# Altium PCB PWR Board 10A.PcbDoc (part 7 of 10)
Units mm, origin at the board's own origin, x right, y up, seen from the top; angles counter-clockwise.
Board outline 355 x 325 mm, 4 copper layers (Top Layer, Layer 1, Layer 2, Bottom Layer), stack 1.636 mm thick; 617 components, 308 nets, 1518 pads, 1199 vias.
Unrouted connection lines stored in the file: 361.
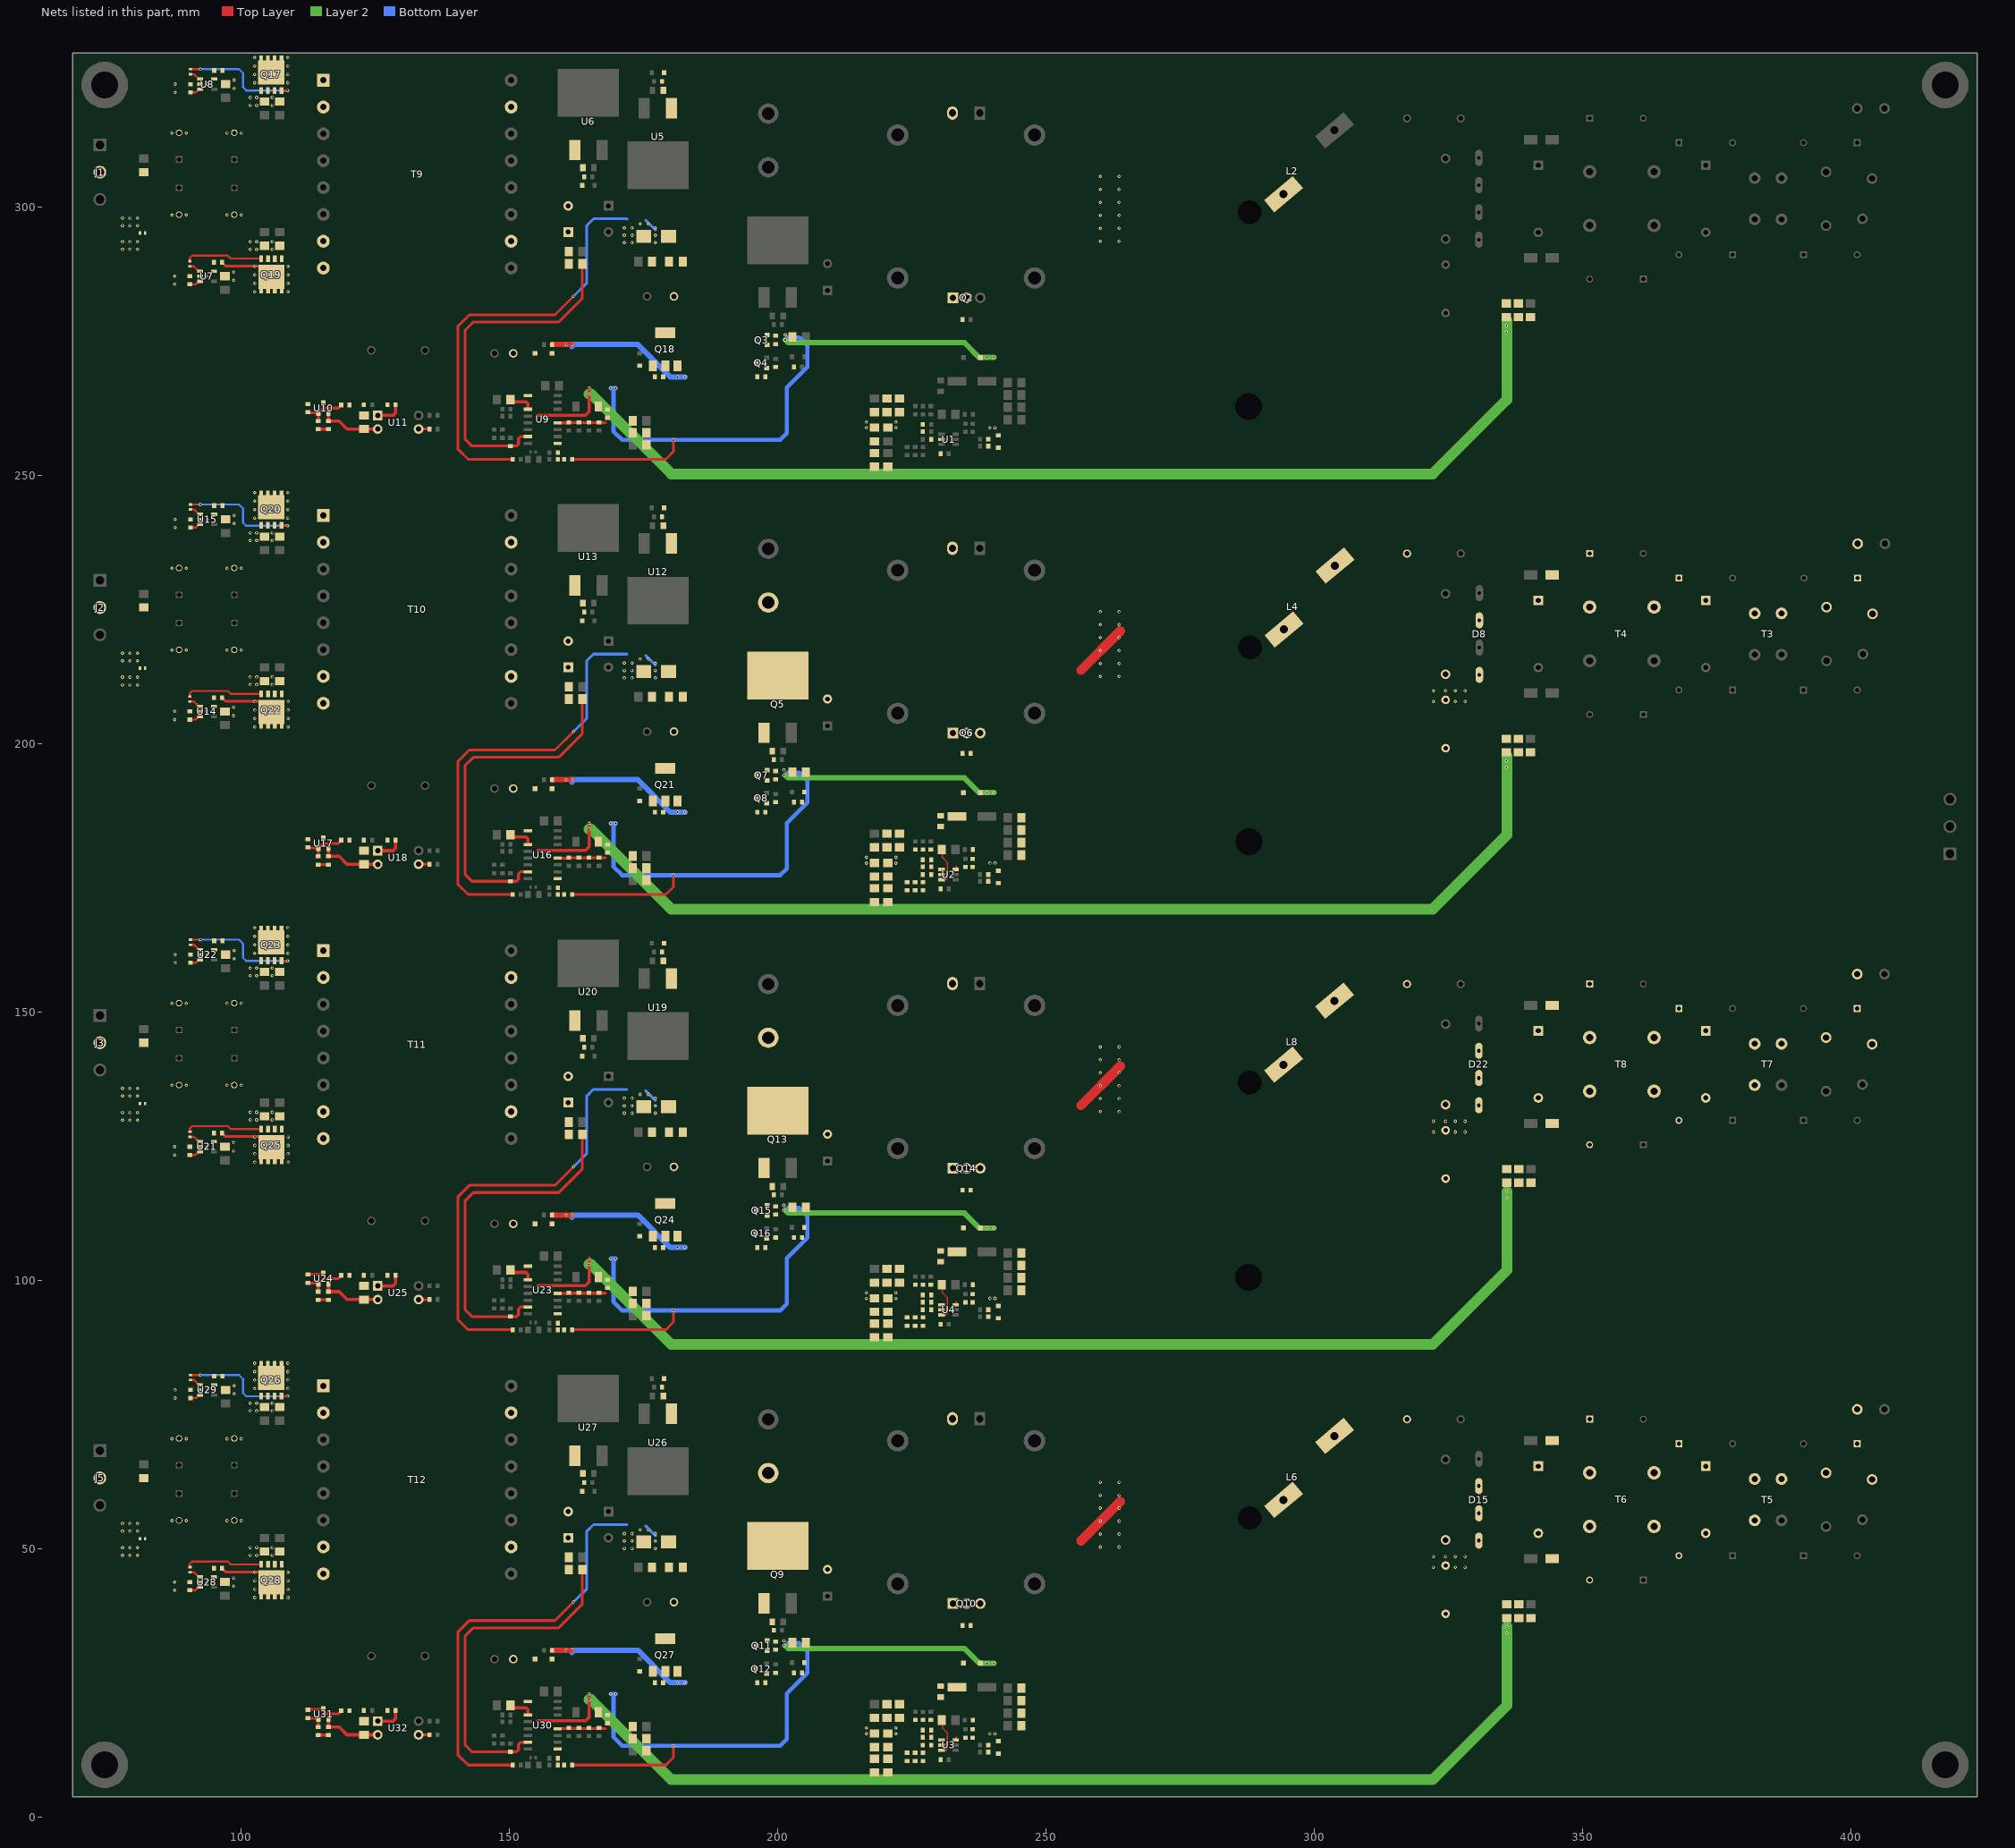
[diagram p5: the nets of this part, all layers, seen from the top]

## Via types
v1: diameter 0.6, hole 0.3, Top Layer to Bottom Layer, 1199 vias

## Nets (pads, with @x,y where several pads share a name; then routed paths per layer and width w, separated by ;. In a path a pad name is that pad's centre, name@x,y a point inside that pad or via, vN(x,y) a via of type N, cw(c..) or ccw(c..) an arc to the next point about the centre after c; other vN are vias at no path point) (continued)
NetC27_2: C27.2 D8.1 L3.1
  other v1: 322.224,207.797 326.339,207.797 328.137,207.797 322.224,209.79 324.51,209.79 326.339,209.79 328.137,209.79
NetC28_2: C28.2 L3.2 L4.1
NetC29_1: C29.1 C34.1 F2.2 T3.2 VR2.1
NetC30_1: C30.1 C32.1 T3.3 T4.2
NetC31_1: C31.1 C33.1 D8.3 D9.2 T4.3
NetC35_2: C35.2 Q5.2 RT2.2
NetC36_2: C36.2 Q5.1 Q7.3 R28.2
NetC37_1: C37.1 C38.2 C39.2 R36.1 R39.1 R41.2
NetC38_1: C38.1 C39.1 Q6.3 R35.2 R41.1 R47.1 R48.1 R49.2 R50.2
NetC40_1: C40.1 D14.1 R45.2
NetC41_2: C41.2 C42.2 U2.6 | length 0.3
  Top Layer w0.381: U2.6@233.189,176.763 233.375,176.948
NetC42_1: C42.1 R46.2 | length 0.1
  Top Layer w0.381: C42.1@236.356,178.472 C42.1@236.394,178.51 ; R46.2@236.394,180.187 R46.2@236.432,180.225
NetC43_2: C43.2 R40.2 U2.3 | length 7
  Top Layer w0.254: U2.3@230.569,174.607 231.415,174.607 231.619,174.81 231.619,177.85 230.762,178.708 230.762,180.073 C43.2@230.609,180.225
NetC44_1: C44.1 D13.2 R40.1
NetC45_2: C45.2 R37.1 R38.1 R43.2 R44.2 U2.1
NetC48_2: C48.2 C53.2 T5.4 T6.1
NetC49_2: C49.2 C54.2 D15.2 D17.2 T6.4
NetC50_2: C50.2 D15.1 L5.1
  other v1: 322.224,46.496 326.339,46.496 328.137,46.496 322.224,48.489 324.51,48.489 326.339,48.489 328.137,48.489
NetC51_2: C51.2 L5.2 L6.1
NetC52_1: C52.1 C57.1 F3.2 T5.2 VR3.1
NetC53_1: C53.1 C55.1 T5.3 T6.2
NetC54_1: C54.1 C56.1 D15.3 D16.2 T6.3
NetC58_2: C58.2 Q9.2 RT3.2
NetC59_2: C59.2 Q9.1 Q11.3 R54.2
NetC60_1: C60.1 C61.2 C62.2 R62.1 R65.1 R67.2
NetC61_1: C61.1 C62.1 Q10.3 R61.2 R67.1 R73.1 R74.1 R75.2 R76.2
NetC63_1: C63.1 D21.1 R71.2
NetC64_2: C64.2 C65.2 U3.6 | length 0.3
  Top Layer w0.381: U3.6@233.189,14.558 233.375,14.744
NetC65_1: C65.1 R72.2 | length 0.1
  Top Layer w0.381: C65.1@236.356,16.268 C65.1@236.394,16.306 ; R72.2@236.394,17.982 R72.2@236.432,18.02
NetC66_2: C66.2 R66.2 U3.3 | length 7
  Top Layer w0.254: U3.3@230.569,12.402 231.415,12.402 231.619,12.605 231.619,15.646 230.762,16.503 230.762,17.868 C66.2@230.609,18.02
NetC67_1: C67.1 D20.2 R66.1
NetC68_2: C68.2 R63.1 R64.1 R69.2 R70.2 U3.1
NetC71_2: C71.2 C76.2 T7.4 T8.1
NetC72_2: C72.2 C77.2 D22.2 D24.2 T8.4
NetC73_2: C73.2 D22.1 L7.1
  other v1: 322.224,127.598 326.339,127.598 328.137,127.598 322.224,129.591 324.51,129.591 326.339,129.591 328.137,129.591
NetC74_2: C74.2 L7.2 L8.1
NetC75_1: C75.1 C80.1 F4.2 T7.2 VR4.1
NetC76_1: C76.1 C78.1 T7.3 T8.2
NetC77_1: C77.1 C79.1 D22.3 D23.2 T8.3
NetC81_2: C81.2 Q13.2 RT4.2
NetC82_2: C82.2 Q13.1 Q15.3 R80.2
NetC83_1: C83.1 C84.2 C85.2 R88.1 R91.1 R93.2
NetC84_1: C84.1 C85.1 Q14.3 R87.2 R93.1 R99.1 R100.1 R101.2 R102.2
NetC86_1: C86.1 D28.1 R97.2
NetC87_2: C87.2 C88.2 U4.6 | length 0.3
  Top Layer w0.381: U4.6@233.189,95.661 233.375,95.846
NetC88_1: C88.1 R98.2 | length 0.1
  Top Layer w0.381: C88.1@236.356,97.37 C88.1@236.394,97.408 ; R98.2@236.394,99.084 R98.2@236.432,99.123
NetC89_2: C89.2 R92.2 U4.3 | length 7
  Top Layer w0.254: U4.3@230.569,93.504 231.415,93.504 231.619,93.708 231.619,96.748 230.762,97.605 230.762,98.97 C89.2@230.609,99.123
NetC90_1: C90.1 D27.2 R92.1
NetC91_2: C91.2 R89.1 R90.1 R95.2 R96.2 U4.1
NetC94_2: C94.2 C102.1 C103.2 C104.2 T9.10
NetC105_1: C105.1 C106.2 Q18.2 Q18.4 R107.1 R109.2
NetC109_2: C109.2 U7.3 | length 2.1
  Top Layer w0.381: C109.2@90.546,285.528 91.542,285.528 92.007,285.993 92.266,285.993 U7.3@92.375,286.102
NetC111_2: C111.2 U8.3 | length 2.1
  Top Layer w0.381: C111.2@90.602,321.317 91.598,321.317 92.062,321.782 92.321,321.782 U8.3@92.431,321.891
NetC118_1: C118.1 C120.1 D34.2 U9.3 | length 4.6
  Top Layer w0.6: C120.1@150.237,264 150.606,263.631 153.134,263.631 153.486,263.28 U9.3@153.486,262.262
NetC124_2: C124.2 R123.1 R126.2 U9.9
NetC126_1: C126.1 R133.2 U10.2 U11.2 | length 11.2
  Top Layer w0.6: U10.2@116.323,261.467 C126.1@116.323,260.049 118.313,260.049 119.794,258.569 U11.2@125.502,258.569
NetC126_2: C126.2 R130.1 | length 1.9
  Top Layer w0.6: R130.1@114.423,258.525 C126.2@116.323,258.525
NetC129_2: C129.2 C137.1 C138.2 C139.2 T10.10
NetC140_1: C140.1 C141.2 Q21.2 Q21.4 R137.1 R139.2
NetC144_2: C144.2 U14.3 | length 2.1
  Top Layer w0.381: C144.2@90.546,204.426 91.542,204.426 92.007,204.891 92.266,204.891 U14.3@92.375,205
NetC146_2: C146.2 U15.3 | length 4.1
  Top Layer w0.381: 91.598,240.215 C146.2@90.602,240.215 91.598,240.215 ; 91.598,240.215 U15.3@92.062,240.679 ; 91.598,240.215 U15.3@92.062,240.679 ; U15.3@92.062,240.679 U15.3@92.321,240.679 ; U15.3@92.062,240.679 U15.3@92.321,240.679 ; U15.3@92.321,240.679 U15.3@92.431,240.789 U15.3@92.321,240.679
NetC153_1: C153.1 C155.1 D40.2 U16.3 | length 4.6
  Top Layer w0.6: C155.1@150.237,182.898 150.606,182.529 153.134,182.529 153.486,182.177 U16.3@153.486,181.16
NetC159_2: C159.2 R153.1 R156.2 U16.9
NetC161_1: C161.1 R163.2 U17.2 U18.2 | length 11.2
  Top Layer w0.6: U17.2@116.323,180.364 C161.1@116.323,178.947 118.313,178.947 119.794,177.466 U18.2@125.501,177.466
NetC161_2: C161.2 R160.1 | length 1.9
  Top Layer w0.508: R160.1@114.423,177.423 C161.2@116.323,177.423
NetC164_2: C164.2 C172.1 C173.2 C174.2 T11.10
NetC175_1: C175.1 C176.2 Q24.2 Q24.4 R167.1 R169.2
NetC179_2: C179.2 U21.3 | length 2.1
  Top Layer w0.381: C179.2@90.546,123.324 91.542,123.324 92.007,123.788 92.266,123.788 U21.3@92.375,123.898
NetC181_2: C181.2 U22.3 | length 4.1
  Top Layer w0.381: 91.598,159.112 C181.2@90.602,159.112 91.598,159.112 ; 91.598,159.112 U22.3@92.062,159.577 ; 91.598,159.112 U22.3@92.062,159.577 ; U22.3@92.062,159.577 U22.3@92.321,159.577 ; U22.3@92.062,159.577 U22.3@92.321,159.577 ; U22.3@92.321,159.577 U22.3@92.431,159.686 U22.3@92.321,159.577
NetC188_1: C188.1 C190.1 D46.2 U23.3 | length 4.6
  Top Layer w0.6: C190.1@150.237,101.796 150.606,101.427 153.134,101.427 153.486,101.075 U23.3@153.486,100.057
NetC194_2: C194.2 R183.1 R186.2 U23.9
NetC196_1: C196.1 R193.2 U24.2 U25.2 | length 11.2
  Top Layer w0.6: U24.2@116.323,99.262 C196.1@116.323,97.844 118.313,97.844 119.794,96.364 U25.2@125.501,96.364
NetC196_2: C196.2 R190.1 | length 1.9
  Top Layer w0.508: R190.1@114.423,96.32 C196.2@116.323,96.32
NetC199_2: C199.2 C207.1 C208.2 C209.2 T12.10
NetC210_1: C210.1 C211.2 Q27.2 Q27.4 R197.1 R199.2
NetC214_2: C214.2 U28.3 | length 2.1
  Top Layer w0.381: C214.2@90.545,42.207 91.54,42.207 92.005,42.671 92.264,42.671 U28.3@92.373,42.781
NetC216_2: C216.2 U29.3 | length 6.2
  Top Layer w0.381: C216.2@90.602,78.01 91.598,78.01 ; C216.2@90.602,78.01 91.598,78.01 ; C216.2@90.602,78.01 91.598,78.01 ; 91.598,78.01 U29.3@92.062,78.474 ; 91.598,78.01 U29.3@92.062,78.474 ; 91.598,78.01 U29.3@92.062,78.474 ; U29.3@92.062,78.474 U29.3@92.321,78.474 ; U29.3@92.062,78.474 U29.3@92.321,78.474 ; U29.3@92.062,78.474 U29.3@92.321,78.474 ; U29.3@92.321,78.474 U29.3@92.431,78.584 ; U29.3@92.321,78.474 U29.3@92.431,78.584 ; U29.3@92.321,78.474 U29.3@92.431,78.584
NetC223_1: C223.1 C225.1 D52.2 U30.3 | length 4.6
  Top Layer w0.6: C225.1@150.237,20.693 150.606,20.324 153.134,20.324 153.486,19.973 U30.3@153.486,18.955
NetC229_2: C229.2 R213.1 R216.2 U30.9
NetC231_1: C231.1 R223.2 U31.2 U32.2 | length 11.2
  Top Layer w0.6: U31.2@116.323,18.159 C231.1@116.323,16.742 118.313,16.742 119.794,15.261 U32.2@125.501,15.262
NetC231_2: C231.2 R220.1 | length 1.9
  Top Layer w0.508: R220.1@114.423,15.218 C231.2@116.323,15.218
NetD5_1: D5.1 R8.2
NetD5_2: D5.2 Q2.1 R5.2 R9.1
  other v1: 239.59,258.813 240.529,258.825
NetD12_1: D12.1 R34.2
NetD12_2: D12.2 Q6.1 R31.2 R35.1
  other v1: 239.59,177.69 240.529,177.703
NetD19_1: D19.1 R60.2
NetD19_2: D19.2 Q10.1 R57.2 R61.1
  other v1: 239.59,15.485 240.529,15.498
NetD26_1: D26.1 R86.2
NetD26_2: D26.2 Q14.1 R83.2 R87.1
  other v1: 239.59,96.588 240.529,96.6
NetD29_2: D29.2 R105.2 R106.1 U5.1
NetD30_1: D30.1 R108.2 T9.15 | length 82.7
  Top Layer w0.508: R108.2@150.622,252.94 142.357,252.94 140.418,254.879 140.418,277.694 142.582,279.857 158.538,279.857 v1(162.018,283.337)
  Bottom Layer w0.508: v1(162.018,283.337) 164.465,285.784 164.465,296.52 165.684,297.739 171.958,297.739 172.034,297.663 ; 175.424,297.51 177.24,295.695 ; v1(177.24,293.295) v1@177.266,293.268
  other v1: 171.45,293.295 172.872,293.295 171.45,294.679 172.872,294.679 177.24,294.679 171.45,296.063 172.872,296.063 177.24,296.063 174.396,296.799 175.895,296.799
NetD30_2: D30.2 R107.2
NetD31_2: D31.2 R110.2 R111.1 U6.1
NetD32_1: D32.1 Q18.1 R109.1
NetD33_2: D33.2 R120.2
NetD35_2: D35.2 R135.2 R136.1 U12.1
NetD36_1: D36.1 R138.2 T10.15 | length 82.6
  Top Layer w0.508: R138.2@150.622,171.838 142.357,171.838 140.418,173.777 140.418,196.591 142.582,198.755 158.538,198.755 v1(162.018,202.235)
  Bottom Layer w0.508: v1(162.018,202.235) 164.465,204.682 164.465,215.417 165.684,216.636 171.958,216.636 ; 175.424,216.407 177.24,214.592 ; v1(177.24,212.192) v1@177.266,212.166
  other v1: 171.45,212.192 172.872,212.192 171.45,213.576 172.872,213.576 177.24,213.576 171.45,214.96 172.872,214.96 177.24,214.96 174.396,215.697 175.895,215.697
NetD36_2: D36.2 R137.2
NetD37_2: D37.2 R140.2 R141.1 U13.1
NetD38_1: D38.1 Q21.1 R139.1
NetD39_2: D39.2 R150.2
NetD41_2: D41.2 R165.2 R166.1 U19.1
NetD42_1: D42.1 R168.2 T11.15 | length 82.6
  Top Layer w0.508: R168.2@150.622,90.736 142.357,90.736 140.418,92.675 140.418,115.489 142.582,117.653 158.538,117.653 v1(162.018,121.132)
  Bottom Layer w0.508: v1(162.018,121.132) 164.465,123.58 164.465,134.315 165.684,135.534 171.958,135.534 ; 175.424,135.305 177.24,133.49 ; v1(177.24,131.09) v1@177.266,131.064
  other v1: 171.45,131.09 172.872,131.09 171.45,132.474 172.872,132.474 177.24,132.474 171.45,133.858 172.872,133.858 177.24,133.858 174.396,134.594 175.895,134.594
NetD42_2: D42.2 R167.2
NetD43_2: D43.2 R170.2 R171.1 U20.1
NetD44_1: D44.1 Q24.1 R169.1
NetD45_2: D45.2 R180.2
NetD47_2: D47.2 R195.2 R196.1 U26.1
NetD48_1: D48.1 R198.2 T12.15 | length 82.6
  Top Layer w0.508: R198.2@150.622,9.633 142.357,9.633 140.418,11.572 140.418,34.387 142.582,36.55 158.538,36.55 v1(162.018,40.03)
  Bottom Layer w0.508: v1(162.018,40.03) 164.465,42.477 164.465,53.213 165.684,54.432 171.958,54.432 ; 175.424,54.203 177.24,52.388 ; v1(177.24,49.988) v1@177.266,49.961
  other v1: 171.45,49.988 172.872,49.988 171.45,51.372 172.872,51.372 177.24,51.372 171.45,52.756 172.872,52.756 177.24,52.756 174.396,53.492 175.895,53.492
NetD48_2: D48.2 R197.2
NetD49_2: D49.2 R200.2 R201.1 U27.1
NetD50_1: D50.1 Q27.1 R199.1
NetD51_2: D51.2 R210.2
NetQ3_1: Q3.1 Q4.3 R16.1
NetQ4_1: Q4.1 R19.1 R25.2 R26.2
NetQ7_1: Q7.1 Q8.3 R42.1
NetQ8_1: Q8.1 R45.1 R51.2 R52.2
NetQ11_1: Q11.1 Q12.3 R68.1
NetQ12_1: Q12.1 R71.1 R77.2 R78.2
NetQ15_1: Q15.1 Q16.3 R94.1
NetQ16_1: Q16.1 R97.1 R103.2 R104.2
NetR1_1: R1.1 R3.2
NetR3_1: R3.1 R6.2
NetR4_1: R4.1 R7.2
NetR6_1: R6.1 R11.2 R12.2
NetR7_1: R7.1 R10.2
NetR27_1: R27.1 R29.2
NetR29_1: R29.1 R32.2
NetR30_1: R30.1 R33.2
NetR32_1: R32.1 R37.2 R38.2
NetR33_1: R33.1 R36.2
NetR53_1: R53.1 R55.2
NetR55_1: R55.1 R58.2
NetR56_1: R56.1 R59.2
NetR58_1: R58.1 R63.2 R64.2
NetR59_1: R59.1 R62.2
NetR79_1: R79.1 R81.2
NetR81_1: R81.1 R84.2
NetR82_1: R82.1 R85.2
NetR84_1: R84.1 R89.2 R90.2
NetR85_1: R85.1 R88.2
NetR113_2: R113.2 U7.5
NetR114_2: R114.2 U8.5
NetR115_2: R115.2 U7.1 | length 2.2
  Top Layer w0.381: R115.2@90.546,288.894 91.234,288.894 92.016,288.112 92.266,288.112 U7.1@92.375,288.002
NetR116_2: R116.2 U8.1 | length 2.2
  Top Layer w0.381: R116.2@90.602,324.683 91.289,324.683 92.071,323.901 92.321,323.901 U8.1@92.431,323.791
NetR117_2: R117.2 R118.1
NetR118_2: R118.2 R119.1
NetR119_2: R119.2 U9.1 | length 211.9
  Top Layer w0.6: 155.332,261.163 164.214,261.163 164.871,261.82 v1(164.871,265.138) v1(164.871,266.192)
  Layer 2 w2: v1(164.871,265.138) 165.265,265.138 180.209,250.194 322.076,250.194 335.915,264.033 335.915,277.518 335.915,278.754
  other v1: 335.813,276.615 335.813,277.851
NetR121_1: R121.1 R122.2
NetR122_1: R122.1 R124.2
NetR127_1: R127.1 R130.2 R131.1 U10.1 | length 8.4
  Top Layer w0.508: R127.1@112.463,261.705 112.534,261.633 114.267,261.633 114.423,261.477 U10.1@114.423,261.467 R130.2@114.423,260.049 ; U10.1@114.423,261.517 115.378,262.471 118.152,262.471 118.56,262.879 118.567,262.879 118.694,263.006 R131.1@118.694,263.07
NetR129_2: R129.2 U11.3 | length 2
  Top Layer w0.508: U11.3@133.121,258.579 R129.2@135.128,258.579
NetR131_2: R131.2 R132.1 R133.1 R134.2
NetR134_1: R134.1 U11.1 | length 5
  Top Layer w0.6: U11.1@125.501,261.109 128.368,261.109 128.829,261.569 R134.1@128.829,263.095
NetR143_2: R143.2 U14.5
NetR144_2: R144.2 U15.5
NetR145_2: R145.2 U14.1 | length 2.2
  Top Layer w0.381: R145.2@90.546,207.792 91.234,207.792 92.016,207.01 92.266,207.01 U14.1@92.375,206.9
NetR146_2: R146.2 U15.1 | length 4.4
  Top Layer w0.381: 91.289,243.58 R146.2@90.602,243.58 91.289,243.58 ; 91.289,243.58 U15.1@92.071,242.798 ; 91.289,243.58 U15.1@92.071,242.798 ; U15.1@92.071,242.798 U15.1@92.321,242.798 ; U15.1@92.071,242.798 U15.1@92.321,242.798 ; U15.1@92.321,242.798 U15.1@92.431,242.689 U15.1@92.321,242.798
NetR147_2: R147.2 R148.1
NetR148_2: R148.2 R149.1
NetR149_2: R149.2 U16.1 | length 211.9
  Top Layer w0.6: 155.332,180.06 164.214,180.06 164.871,180.718 v1(164.871,184.036) v1(164.871,185.09)
  Layer 2 w2: v1(164.871,184.036) 165.265,184.036 180.209,169.091 322.076,169.091 335.915,182.931 335.915,196.415 335.915,197.651
  other v1: 335.813,195.512 335.813,196.748
NetR151_1: R151.1 R152.2
NetR152_1: R152.1 R154.2
NetR157_1: R157.1 R160.2 R161.1 U17.1 | length 8.4
  Top Layer w0.508: R157.1@112.462,180.602 112.534,180.53 114.267,180.53 114.423,180.374 U17.1@114.423,180.364 R160.2@114.423,178.947 ; U17.1@114.423,180.414 115.377,181.368 118.152,181.368 118.56,181.777 118.567,181.777 118.694,181.904 R161.1@118.694,181.967
NetR159_2: R159.2 U18.3 | length 2
  Top Layer w0.508: U18.3@133.121,177.476 R159.2@135.128,177.476
NetR161_2: R161.2 R162.1 R163.1 R164.2
NetR164_1: R164.1 U18.1 | length 5
  Top Layer w0.6: U18.1@125.501,180.006 128.368,180.006 128.829,180.467 R164.1@128.829,181.993
NetR173_2: R173.2 U21.5
NetR174_2: R174.2 U22.5
NetR175_2: R175.2 U21.1 | length 2.2
  Top Layer w0.381: R175.2@90.546,126.689 91.234,126.689 92.016,125.907 92.266,125.907 U21.1@92.375,125.798
NetR176_2: R176.2 U22.1 | length 4.4
  Top Layer w0.381: 91.289,162.478 R176.2@90.602,162.478 91.289,162.478 ; 91.289,162.478 U22.1@92.071,161.696 ; 91.289,162.478 U22.1@92.071,161.696 ; U22.1@92.071,161.696 U22.1@92.321,161.696 ; U22.1@92.071,161.696 U22.1@92.321,161.696 ; U22.1@92.321,161.696 U22.1@92.431,161.586 U22.1@92.321,161.696
NetR177_2: R177.2 R178.1
NetR178_2: R178.2 R179.1
NetR179_2: R179.2 U23.1 | length 211.9
  Top Layer w0.6: 155.332,98.958 164.214,98.958 164.871,99.615 v1(164.871,102.934) v1(164.871,103.987)
  Layer 2 w2: v1(164.871,102.934) 165.265,102.934 180.209,87.989 322.076,87.989 335.915,101.828 v1(335.915,115.313) v1(335.915,116.549)
NetR181_1: R181.1 R182.2
NetR182_1: R182.1 R184.2
NetR187_1: R187.1 R190.2 R191.1 U24.1 | length 8.4
  Top Layer w0.508: R187.1@112.462,99.5 112.534,99.428 114.267,99.428 114.423,99.272 U24.1@114.423,99.262 R190.2@114.423,97.844 ; U24.1@114.423,99.312 115.377,100.266 118.152,100.266 118.56,100.674 118.567,100.674 118.694,100.801 R191.1@118.694,100.865
NetR189_2: R189.2 U25.3 | length 2
  Top Layer w0.508: U25.3@133.121,96.374 R189.2@135.128,96.374
NetR191_2: R191.2 R192.1 R193.1 R194.2
NetR194_1: R194.1 U25.1 | length 5
  Top Layer w0.6: U25.1@125.501,98.904 128.368,98.904 128.829,99.364 R194.1@128.829,100.89
NetR203_2: R203.2 U28.5
NetR204_2: R204.2 U29.5
NetR205_2: R205.2 U28.1 | length 2.2
  Top Layer w0.381: R205.2@90.545,45.572 91.232,45.572 92.014,44.79 92.264,44.79 U28.1@92.373,44.681
NetR206_2: R206.2 U29.1 | length 6.6
  Top Layer w0.381: R206.2@90.602,81.375 91.289,81.375 ; R206.2@90.602,81.375 91.289,81.375 ; R206.2@90.602,81.375 91.289,81.375 ; 91.289,81.375 U29.1@92.071,80.593 ; 91.289,81.375 U29.1@92.071,80.593 ; 91.289,81.375 U29.1@92.071,80.593 ; U29.1@92.071,80.593 U29.1@92.321,80.593 ; U29.1@92.071,80.593 U29.1@92.321,80.593 ; U29.1@92.071,80.593 U29.1@92.321,80.593 ; U29.1@92.321,80.593 U29.1@92.431,80.484 ; U29.1@92.321,80.593 U29.1@92.431,80.484 ; U29.1@92.321,80.593 U29.1@92.431,80.484
NetR207_2: R207.2 R208.1
NetR208_2: R208.2 R209.1
NetR209_2: R209.2 U30.1 | length 211.9
  Top Layer w0.6: 155.332,17.856 164.214,17.856 164.871,18.513 v1(164.871,21.831) v1(164.871,22.885)
  Layer 2 w2: v1(164.871,21.831) 165.265,21.831 180.209,6.887 322.076,6.887 335.915,20.726 v1(335.915,34.211) v1(335.915,35.447)
NetR211_1: R211.1 R212.2
NetR212_1: R212.1 R214.2
NetR217_1: R217.1 R220.2 R221.1 U31.1 | length 8.4
  Top Layer w0.508: R217.1@112.462,18.397 112.534,18.326 114.267,18.326 114.423,18.17 U31.1@114.423,18.159 R220.2@114.423,16.742 ; U31.1@114.423,18.209 115.377,19.164 118.152,19.164 118.56,19.572 118.567,19.572 118.694,19.699 R221.1@118.694,19.762
NetR219_2: R219.2 U32.3 | length 2
  Top Layer w0.508: U32.3@133.121,15.272 R219.2@135.128,15.272
NetR221_2: R221.2 R222.1 R223.1 R224.2
NetR224_1: R224.1 U32.1 | length 5
  Top Layer w0.6: U32.1@125.501,17.801 128.368,17.801 128.829,18.262 R224.1@128.829,19.788
PGND-C1: C101.1 J1.2 NT1.2 R127.2 U10.3
  other v1: 77.953,292.024 79.35,292.024 80.747,292.024 77.953,293.446 79.35,293.446 80.747,293.446 77.953,296.494 79.35,296.494 80.747,296.494 77.953,297.917 79.35,297.917 80.747,297.917
PGND-C2: C136.1 J2.2 NT2.2 R157.2 U17.3
  other v1: 77.953,210.921 79.35,210.921 80.747,210.921 77.953,212.344 79.35,212.344 80.747,212.344 77.953,215.392 79.35,215.392 80.747,215.392 77.953,216.814 79.35,216.814 80.747,216.814
PGND-C3: C171.1 J3.2 NT3.2 R187.2 U24.3 | length 3
  Top Layer w0.508: R187.2@112.462,101.024 112.521,101.082 115.217,101.082 115.373,101.238 U24.3@115.373,101.262
  other v1: 77.953,129.819 79.35,129.819 80.747,129.819 77.953,131.242 79.35,131.242 80.747,131.242 77.953,134.29 79.35,134.29 80.747,134.29 77.953,135.712 79.35,135.712 80.747,135.712
PGND-C4: C206.1 J5.2 NT4.2 R217.2 U31.3 | length 3
  Top Layer w0.508: R217.2@112.462,19.921 112.521,19.98 115.217,19.98 115.373,20.136 U31.3@115.373,20.159
  other v1: 77.953,48.717 79.35,48.717 80.747,48.717 77.953,50.139 79.35,50.139 80.747,50.139 77.953,53.187 79.35,53.187 80.747,53.187 77.953,54.61 79.35,54.61 80.747,54.61
RVCC-C1: C17.2 C114.2 C115.2 C116.2 C117.2 D6.1 Q3.2 R16.2 R120.1 R123.2 U9.12 | length 136.3
  Top Layer w0.508: U9.12@159.036,259.722 161.036,259.722 C117.2@161.112,259.798 ; C117.2@161.112,259.76 162.047,259.76 167.907,259.76 ; R123.2@161.754,252.942 R123.2@161.752,252.943 163.846,252.943 179.188,252.943 180.612,254.368 v1(180.612,256.534)
  Layer 2 w1: v1(201.449,275.181) 201.954,274.676 234.848,274.676 237.605,271.919 v1(239.037,271.919) v1(240.33,271.919)
  Bottom Layer w0.8: v1(168.91,266.192) v1(169.85,266.192) 169.423,265.765 169.423,258.163 171.045,256.541 200.508,256.541 201.741,257.774 201.741,266.275 205.571,270.105 205.571,274.133 204.077,275.627 201.894,275.627 v1(201.449,275.181) v1@201.476,275.209
  other v1: 201.449,276.131
RVCC-C2: C40.2 C149.2 C150.2 C151.2 C152.2 D13.1 Q7.2 R42.2 R150.1 R153.2 U16.12 | length 136.3
  Top Layer w0.508: U16.12@159.036,178.62 161.036,178.62 C152.2@161.112,178.696 ; C152.2@161.112,178.658 162.047,178.658 167.907,178.658 ; R153.2@161.752,171.847 163.846,171.847 179.188,171.847 180.612,173.272 v1(180.612,175.439)
  Layer 2 w1: v1@201.449,194.079 201.954,193.573 234.848,193.573 237.605,190.817 v1(239.037,190.817) v1(240.33,190.817)
  Bottom Layer w0.8: v1(168.91,185.09) v1(169.85,185.09) 169.423,184.663 169.423,177.061 171.045,175.439 v1(180.612,175.439) 200.508,175.439 201.741,176.671 201.741,185.173 205.571,189.002 205.571,193.031 204.077,194.525 201.894,194.525 v1@201.449,194.079
  other v1: 201.195,194.079 201.195,195.029
RVCC-C3: C86.2 C184.2 C185.2 C186.2 C187.2 D27.1 Q15.2 R94.2 R180.1 R183.2 U23.12 | length 136.3
  Top Layer w0.508: U23.12@159.036,97.517 161.036,97.517 C187.2@161.112,97.594 ; C187.2@161.112,97.555 162.047,97.555 167.907,97.555 ; R183.2@161.754,90.737 R183.2@161.752,90.739 163.846,90.739 179.188,90.739 180.612,92.163 v1(180.612,94.33)
  Layer 2 w1: v1@201.449,112.977 201.954,112.471 234.848,112.471 237.605,109.714 v1(239.037,109.714) v1(240.33,109.714)
  Bottom Layer w0.8: v1(168.91,103.987) v1(169.85,103.987) 169.423,103.56 169.423,95.958 171.045,94.336 180.612,94.336 200.508,94.336 201.741,95.569 201.741,104.07 205.571,107.9 205.571,111.929 204.077,113.422 201.894,113.422 v1@201.449,112.977
  other v1: 201.195,112.977 201.195,113.927
RVCC-C4: C63.2 C219.2 C220.2 C221.2 C222.2 D20.1 Q11.2 R68.2 R210.1 R213.2 U30.12 | length 136.3
  Top Layer w0.508: U30.12@159.036,16.415 161.036,16.415 C222.2@161.112,16.491 ; C222.2@161.112,16.453 162.047,16.453 167.907,16.453 ; R213.2@161.754,9.635 R213.2@161.752,9.636 163.846,9.636 179.188,9.636 180.612,11.061 v1(180.612,13.227)
  Layer 2 w1: v1@201.449,31.874 201.954,31.369 234.848,31.369 237.605,28.612 v1(239.037,28.612) v1(240.33,28.612)
  Bottom Layer w0.8: v1(168.91,22.885) v1(169.85,22.885) 169.423,22.458 169.423,14.856 171.045,13.234 180.612,13.234 200.508,13.234 201.741,14.467 201.741,22.968 205.571,26.797 205.571,30.826 204.077,32.32 201.894,32.32 v1@201.449,31.874
  other v1: 201.195,31.874 201.195,32.824
SGND-C1: C95.2 C96.2 C97.2 C98.2 C99.2 C100.2 C107.1 C108.1 C109.1 C110.1 C111.1 C112.1 NT1.1 Q17.1 Q17.2 Q17.3 Q19.1 Q19.2 Q19.3 U7.2 U8.2
  other v1: 87.651,285.528 98.674,286.29 87.651,287.052 93.675,287.052 98.674,287.814 101.766,292.049 102.946,292.049 105.842,292.049 101.766,293.472 102.946,293.472 105.842,293.472 87.153,298.479 89.814,298.479 97.426,298.479 100.087,298.479 87.153,313.741 89.814,313.741 97.426,313.741 100.087,313.741 101.766,318.922 102.946,318.922 105.842,318.922 101.766,320.345 102.946,320.345 105.842,320.345 87.706,321.317 98.73,322.079 87.706,322.841 93.731,322.841 98.73,323.603
SGND-C2: C130.2 C131.2 C132.2 C133.2 C134.2 C135.2 C142.1 C143.1 C144.1 C145.1 C146.1 C147.1 NT2.1 Q20.1 Q20.2 Q20.3 Q22.1 Q22.2 Q22.3 U14.2 U15.2
  other v1: 87.651,204.426 98.674,205.188 87.651,205.95 93.675,205.95 98.674,206.712 101.766,210.947 102.946,210.947 105.842,210.947 101.766,212.369 102.946,212.369 105.842,212.369 87.153,217.377 89.814,217.377 97.426,217.377 100.087,217.377 87.153,232.638 89.814,232.638 97.426,232.638 100.087,232.638 101.766,237.82 102.946,237.82 105.842,237.82 101.766,239.242 102.946,239.242 105.842,239.242 87.706,240.215 98.73,240.977 87.706,241.739 93.731,241.739 98.73,242.501
SGND-C3: C165.2 C166.2 C167.2 C168.2 C169.2 C170.2 C177.1 C178.1 C179.1 C180.1 C181.1 C182.1 NT3.1 Q23.1 Q23.2 Q23.3 Q25.1 Q25.2 Q25.3 U21.2 U22.2
  other v1: 87.651,123.324 98.674,124.086 87.651,124.848 93.675,124.848 98.674,125.61 101.766,129.845 102.946,129.845 105.842,129.845 101.766,131.267 102.946,131.267 105.842,131.267 87.153,136.275 89.814,136.275 97.426,136.275 100.087,136.275 87.153,151.536 89.814,151.536 97.426,151.536 100.087,151.536 101.766,156.718 102.946,156.718 105.842,156.718 101.766,158.14 102.946,158.14 105.842,158.14 87.706,159.112 98.73,159.874 87.706,160.636 93.731,160.636 98.73,161.398
SGND-C4: C200.2 C201.2 C202.2 C203.2 C204.2 C205.2 C212.1 C213.1 C214.1 C215.1 C216.1 C217.1 NT4.1 Q26.1 Q26.2 Q26.3 Q28.1 Q28.2 Q28.3 U28.2 U29.2
  other v1: 87.649,42.207 98.673,42.969 87.649,43.731 93.673,43.731 98.673,44.493 101.766,48.742 102.946,48.742 105.842,48.742 101.766,50.165 102.946,50.165 105.842,50.165 87.153,55.172 89.814,55.172 97.426,55.172 100.087,55.172 87.153,70.434 89.814,70.434 97.426,70.434 100.087,70.434 101.766,75.615 102.946,75.615 105.842,75.615 101.766,77.038 102.946,77.038 105.842,77.038 87.706,78.01 98.73,78.772 87.706,79.534 93.731,79.534 98.73,80.296
VCC-C1: C119.2 D34.1 Q18.3 R25.1 | length 27.7
  Top Layer w1: C119.2@157.988,274.327 v1(160.684,274.327) v1(161.718,274.327)
  Bottom Layer w1: 161.718,273.903 v1(161.718,274.327) 173.958,274.327 180.003,268.282 v1(182.754,268.282)
  other v1: 181.383,268.282
VCC-C2: C154.2 D40.1 Q21.3 R51.1 | length 27.7
  Top Layer w1: C154.2@157.988,193.225 v1(161.718,193.225)
  Bottom Layer w1: 161.718,192.801 v1(161.718,193.225) 173.958,193.225 180.003,187.179 v1(182.754,187.179)
  other v1: 181.383,187.179 160.684,193.225
VCC-C3: C189.2 D46.1 Q24.3 R103.1 | length 27.7
  Top Layer w1: C189.2@157.988,112.122 v1(161.718,112.122)
  Bottom Layer w1: 161.718,111.698 v1(161.718,112.122) 173.958,112.122 180.003,106.077 v1(182.754,106.077)
  other v1: 181.383,106.077 160.684,112.122
VCC-C4: C224.2 D52.1 Q27.3 R77.1 | length 28.6
  Top Layer w1: C224.2@157.988,31.02 159.748,31.02 ; v1(160.684,31.02) 159.748,31.02 ; v1(161.718,31.02) 159.748,31.02
  Bottom Layer w1: 161.718,30.596 v1(161.718,31.02) 173.958,31.02 180.003,24.975 v1(182.754,24.975)
  other v1: 181.383,24.975
VCR-C1: C104.1 C122.2 U9.7 | length 64.7
  Top Layer w0.508: U9.7@153.486,257.182 152.107,257.182 151.736,256.811 151.736,255.779 151.362,255.404 C122.2@150.241,255.404 143.064,255.404 141.749,256.719 141.749,276.935 143.325,278.511 159.228,278.511 163.649,282.932 C104.1@163.649,289.361
VCR-C2: C139.1 C157.2 U16.7 | length 64.7
  Top Layer w0.508: U16.7@153.486,176.08 152.107,176.08 151.736,175.709 151.736,174.676 151.362,174.302 150.241,174.302 143.064,174.302 141.749,175.617 141.749,195.833 143.325,197.409 159.228,197.409 163.649,201.83 C139.1@163.649,208.258
VCR-C3: C174.1 C192.2 U23.7 | length 64.7
  Top Layer w0.508: U23.7@153.486,94.977 152.107,94.977 151.736,94.607 151.736,93.574 151.362,93.199 150.241,93.199 143.064,93.199 141.749,94.514 141.749,114.73 143.325,116.306 159.228,116.306 163.649,120.727 C174.1@163.649,127.156
VCR-C4: C209.1 C227.2 U30.7 | length 64.7
  Top Layer w0.508: U30.7@153.486,13.875 152.107,13.875 151.736,13.504 151.736,12.471 151.362,12.097 150.241,12.097 143.064,12.097 141.749,13.412 141.749,33.628 143.325,35.204 159.228,35.204 163.649,39.625 C209.1@163.649,46.054
VD-C1: C14.2 D4.2 L2.2 Q2.2 R4.2
  other v1: 216.586,258.775 222.06,258.775 216.586,259.867 222.06,259.867 260.147,293.573 263.689,293.573 260.147,295.986 263.689,295.986 260.147,298.399 263.689,298.399 260.147,300.812 263.689,300.812 260.147,303.225 263.689,303.225 260.147,305.638 263.689,305.638
VD-C2: C37.2 D11.2 L4.2 Q6.2 R30.2 | length 10.3
  Top Layer w1.8: 256.577,213.651 263.855,220.929
  other v1: 216.586,177.673 222.06,177.673 216.586,178.765 222.06,178.765 260.147,212.471 263.689,212.471 260.147,214.884 263.689,214.884 260.147,217.297 263.689,217.297 260.147,219.71 263.689,219.71 260.147,222.123 263.689,222.123 260.147,224.536 263.689,224.536
VD-C3: C83.2 D25.2 L8.2 Q14.2 R82.2 | length 10.3
  Top Layer w1.8: 256.577,132.549 263.855,139.827
  other v1: 216.586,96.571 222.06,96.571 216.586,97.663 222.06,97.663 260.147,131.369 263.689,131.369 260.147,133.782 263.689,133.782 260.147,136.195 263.689,136.195 260.147,138.608 263.689,138.608 260.147,141.021 263.689,141.021 260.147,143.434 263.689,143.434
VD-C4: C60.2 D18.2 L6.2 Q10.2 R56.2 | length 10.3
  Top Layer w1.8: 256.577,51.446 263.855,58.724
  other v1: 216.586,15.468 222.06,15.468 216.586,16.56 222.06,16.56 260.147,50.266 263.689,50.266 260.147,52.679 263.689,52.679 260.147,55.092 263.689,55.092 260.147,57.505 263.689,57.505 260.147,59.918 263.689,59.918 260.147,62.331 263.689,62.331
VD_R1-C1: Q19.5 Q19.6 Q19.7 Q19.8 R113.1 T9.7 T9.8 | length 10.3
  Top Layer w0.508: R113.1@96.499,289.618 96.499,289.554 96.626,289.427 96.69,289.427 97.173,288.944 103.695,288.944 Q19.8@105.691,286.948
  other v1: 102.595,284.15 108.788,284.15 102.595,285.725 108.788,285.725 102.595,287.299 108.788,287.299 102.595,288.874 108.788,288.874
VD_R1-C2: Q22.5 Q22.6 Q22.7 Q22.8 R143.1 T10.7 T10.8 | length 10.3
  Top Layer w0.508: R143.1@96.499,208.515 96.499,208.452 96.626,208.325 96.69,208.325 97.173,207.842 103.695,207.842 Q22.8@105.691,205.846
  other v1: 102.595,203.047 108.788,203.047 102.595,204.622 108.788,204.622 102.595,206.197 108.788,206.197 102.595,207.772 108.788,207.772
VD_R1-C3: Q25.5 Q25.6 Q25.7 Q25.8 R173.1 T11.7 T11.8 | length 10.3
  Top Layer w0.508: R173.1@96.499,127.413 96.499,127.35 96.626,127.223 96.69,127.223 97.173,126.74 103.695,126.74 Q25.8@105.691,124.744
  other v1: 102.595,121.945 108.788,121.945 102.595,123.52 108.788,123.52 102.595,125.095 108.788,125.095 102.595,126.67 108.788,126.67
VD_R1-C4: Q28.5 Q28.6 Q28.7 Q28.8 R203.1 T12.7 T12.8 | length 10.3
  Top Layer w0.508: R203.1@96.497,46.296 96.497,46.232 96.624,46.105 96.688,46.105 97.171,45.622 103.694,45.622 Q28.8@105.69,43.626
  other v1: 102.595,40.843 108.788,40.843 102.595,42.418 108.788,42.418 102.595,43.992 108.788,43.992 102.595,45.567 108.788,45.567
VD_R2-C1: Q17.5 Q17.6 Q17.7 Q17.8 R114.1 T9.1 T9.2
  other v1: 102.567,323.092 108.761,323.092 102.567,324.667 108.761,324.667 102.567,326.242 108.761,326.242 102.567,327.817 108.761,327.817
VD_R2-C2: Q20.5 Q20.6 Q20.7 Q20.8 R144.1 T10.1 T10.2
  other v1: 102.567,241.99 108.761,241.99 102.567,243.565 108.761,243.565 102.567,245.14 108.761,245.14 102.567,246.715 108.761,246.715
VD_R2-C3: Q23.5 Q23.6 Q23.7 Q23.8 R174.1 T11.1 T11.2
  other v1: 102.567,160.888 108.761,160.888 102.567,162.463 108.761,162.463 102.567,164.037 108.761,164.037 102.567,165.612 108.761,165.612
VD_R2-C4: Q26.5 Q26.6 Q26.7 Q26.8 R204.1 T12.1 T12.2
  other v1: 102.567,79.785 108.761,79.785 102.567,81.36 108.761,81.36 102.567,82.935 108.761,82.935 102.567,84.51 108.761,84.51
VG_R1-C1: Q19.4 R115.1 | length 14.3
  Top Layer w0.381: R115.1@90.5,289.834 90.5,290.459 90.922,290.881 97.587,290.881 98.129,290.338 Q19.4@103.784,290.338
VG_R1-C2: Q22.4 R145.1 | length 14.3
  Top Layer w0.381: R145.1@90.5,208.731 90.5,209.357 90.922,209.779 97.587,209.779 98.129,209.236 Q22.4@103.784,209.236
VG_R1-C3: Q25.4 R175.1 | length 14.3
  Top Layer w0.381: R175.1@90.5,127.629 90.5,128.255 90.922,128.676 97.587,128.676 98.129,128.133 Q25.4@103.784,128.133
VG_R1-C4: Q28.4 R205.1 | length 14.3
  Top Layer w0.381: R205.1@90.498,46.512 90.498,47.138 90.92,47.559 97.585,47.559 98.128,47.016 Q28.4@103.783,47.016
VG_R2-C1: Q17.4 R116.1 | length 22.4
  Top Layer w0.381: R116.1@90.602,325.622 v1(92.431,325.622) ; Q17.4@107.571,321.661 v1(108.712,321.661)
  Bottom Layer w0.381: v1(92.431,325.622) 99.65,325.622 100.397,324.875 100.397,322.259 100.995,321.661 v1(108.712,321.661)
VG_R2-C2: Q20.4 R146.1 | length 22.4
  Top Layer w0.381: R146.1@90.602,244.52 v1(92.431,244.52) ; Q20.4@107.571,240.559 v1(108.712,240.559)
  Bottom Layer w0.381: v1(92.431,244.52) 99.65,244.52 100.397,243.773 100.397,241.157 100.995,240.559 v1(108.712,240.559)
VG_R2-C3: Q23.4 R176.1 | length 22.4
  Top Layer w0.381: R176.1@90.602,163.418 v1(92.431,163.418) ; Q23.4@107.571,159.456 v1(108.712,159.456)
  Bottom Layer w0.381: v1(92.431,163.418) 99.65,163.418 100.397,162.671 100.397,160.054 100.995,159.456 v1(108.712,159.456)
VG_R2-C4: Q26.4 R206.1 | length 22.4
  Top Layer w0.381: R206.1@90.602,82.315 v1(92.431,82.315) ; Q26.4@107.571,78.354 v1(108.712,78.354)
  Bottom Layer w0.381: v1(92.431,82.315) 99.65,82.315 100.397,81.568 100.397,78.952 100.995,78.354 v1(108.712,78.354)
ZCD/CS-C1: C23.1 R13.2 U1.2
ZCD/CS-C2: C46.1 R39.2 U2.2
ZCD/CS-C3: C92.1 R91.2 U4.2
ZCD/CS-C4: C69.1 R65.2 U3.2
pads on no net: L2.M1 L4.M1 L6.M1 L8.M1 T9.9 T9.11 T9.13 T9.16 T10.9 T10.11 T10.13 T10.16 T11.9 T11.11 T11.13 T11.16 T12.9 T12.11 T12.13 T12.16

## Polygon pours and split planes (outlines as drawn)
HS-C1 on Top Layer "HS-C1_L01_P247" (solid, pour order 247): 177.343,322.308 177.343,314.757 160.401,314.757 160.401,303.351 157.354,300.304 136.296,300.304 136.296,325.781 174.828,325.781 174.828,322.308
H_V-C1 on Top Layer "H_V-C1_L01_P246" (solid, pour order 246): 219.202,325.781 183.439,325.781 183.439,313.334 170.586,313.334 170.586,302.539 167.259,302.539 167.259,297.917 192.659,297.917 192.659,314.706 219.202,314.706
VD-C1 on Top Layer "VD-C1_L01_P245" (solid, pour order 245): 269.164,290.322 250.484,290.322 250.484,325.781 269.164,325.781
HS-C2 on Top Layer "HS-C2_L01_P244" (solid, pour order 244): 177.343,241.205 177.343,233.654 160.401,233.654 160.401,222.249 157.354,219.202 136.296,219.202 136.296,244.678 174.828,244.678 174.828,241.205
H_V-C2 on Top Layer "H_V-C2_L01_P243" (solid, pour order 243): 219.202,244.678 183.439,244.678 183.439,232.232 170.586,232.232 170.586,221.437 167.259,221.437 167.259,216.814 192.659,216.814 192.659,233.604 219.202,233.604
VD-C2 on Top Layer "VD-C2_L01_P242" (solid, pour order 242): 269.164,209.22 250.484,209.22 250.484,244.678 269.164,244.678
HS-C4 on Top Layer "HS-C4_L01_P241" (solid, pour order 241): 177.343,79.001 177.343,71.45 160.401,71.45 160.401,60.044 157.354,56.997 136.296,56.997 136.296,82.474 174.828,82.474 174.828,79.001
H_V-C4 on Top Layer "H_V-C4_L01_P004" (solid, pour order 4): 219.202,82.474 183.439,82.474 183.439,70.027 170.586,70.027 170.586,59.232 167.259,59.232 167.259,54.61 192.659,54.61 192.659,71.399 219.202,71.399
VD-C4 on Top Layer "VD-C4_L01_P240" (solid, pour order 240): 269.164,47.015 250.484,47.015 250.484,82.474 269.164,82.474
HS-C3 on Top Layer "HS-C3_L01_P236" (solid, pour order 236): 177.343,160.103 177.343,152.552 160.401,152.552 160.401,141.146 157.354,138.1 136.296,138.1 136.296,163.576 174.828,163.576 174.828,160.103
H_V-C3 on Top Layer "H_V-C3_L01_P002" (solid, pour order 2): 219.202,163.576 183.439,163.576 183.439,151.13 170.586,151.13 170.586,140.335 167.259,140.335 167.259,135.712 192.659,135.712 192.659,152.501 219.202,152.501
PGND-C4 on Top Layer "PGND-C4_L01_P235" (solid, pour order 235): 82.779,64.323 82.779,57.48 81.204,57.48 81.204,27.559 116.129,27.559 116.129,19.699 112.907,19.699 112.907,19.54 69.571,19.54 69.571,64.323
24VDC-C4 on Top Layer "24VDC-C4_L01_P234" (solid, pour order 234): 121.666,72.821 108.712,72.821 108.712,74.556 94.481,74.556 69.571,74.556 69.571,64.901 83.312,64.901 83.312,56.642 101.194,56.642 101.194,50.901 108.915,50.901 108.915,52.73 121.666,52.73 121.666,55.273
24VDC-C1 on Top Layer "24VDC-C1_L01_P233" (solid, pour order 233): 121.666,316.128 108.712,316.128 108.712,317.863 94.481,317.863 69.571,317.863 69.571,308.208 83.312,308.208 83.312,299.949 101.194,299.949 101.194,294.208 108.915,294.208 108.915,296.037 121.666,296.037 121.666,298.58
SGND-C4 on Top Layer "SGND-C4_L01_P232" (solid, pour order 232): 100.762,50.444 100.762,56.159 82.753,56.159 82.753,57.734 81.915,57.734 81.915,28.194 89.738,28.194 89.738,48.082 104.704,48.082 104.704,46.396 108.915,46.396 108.915,50.444 108.915,46.396 108.915,50.444
SGND-C4 on Top Layer "SGND-C4_L01_P230" (solid, pour order 230): 100.813,44.907 100.813,40.284 98.273,40.284 98.273,42.983 96.139,42.983 96.139,43.298 94.158,43.298 94.158,28.194 83.312,28.194 83.312,47.755 89.738,47.755 89.738,44.246 96.139,44.246 96.139,44.907
PGND-C1 on Top Layer "PGND-C1_L01_P229" (solid, pour order 229): 82.779,307.63 82.779,300.787 81.204,300.787 81.204,270.866 116.129,270.866 116.129,263.006 112.907,263.006 112.907,262.847 69.571,262.847 69.571,307.63
SGND-C1 on Top Layer "SGND-C1_L01_P227" (solid, pour order 227): 100.762,293.751 100.762,299.466 82.753,299.466 82.753,301.041 81.915,301.041 81.915,271.501 89.738,271.501 89.738,291.389 104.704,291.389 104.704,289.703 108.915,289.703 108.915,293.751 108.915,289.703 108.915,293.751
SGND-C1 on Top Layer "SGND-C1_L01_P226" (solid, pour order 226): 100.813,288.214 100.813,283.591 98.273,283.591 98.273,286.29 96.139,286.29 96.139,286.605 94.158,286.605 94.158,271.501 83.312,271.501 83.312,291.062 89.738,291.062 89.738,287.553 96.139,287.553 96.139,288.214
PGND-C2 on Top Layer "PGND-C2_L01_P225" (solid, pour order 225): 82.779,226.528 82.779,219.685 81.204,219.685 81.204,189.764 116.129,189.764 116.129,181.904 112.907,181.904 112.907,181.745 69.571,181.745 69.571,226.528
SGND-C2 on Top Layer "SGND-C2_L01_P219" (solid, pour order 219): 100.762,212.649 100.762,218.364 82.753,218.364 82.753,219.939 81.915,219.939 81.915,190.398 89.738,190.398 89.738,210.287 104.704,210.287 104.704,208.601 108.915,208.601 108.915,212.649 108.915,208.601 108.915,212.649
SGND-C2 on Top Layer "SGND-C2_L01_P218" (solid, pour order 218): 100.813,207.111 100.813,202.489 98.273,202.489 98.273,205.188 96.139,205.188 96.139,205.503 94.158,205.503 94.158,190.398 83.312,190.398 83.312,209.959 89.738,209.959 89.738,206.451 96.139,206.451 96.139,207.111
24VDC-C2 on Top Layer "24VDC-C2_L01_P217" (solid, pour order 217): 121.666,235.026 108.712,235.026 108.712,236.76 94.481,236.76 69.571,236.76 69.571,227.106 83.312,227.106 83.312,218.846 101.194,218.846 101.194,213.106 108.915,213.106 108.915,214.935 121.666,214.935 121.666,217.478
PGND-C3 on Top Layer "PGND-C3_L01_P216" (solid, pour order 216): 82.779,145.425 82.779,138.582 81.204,138.582 81.204,108.661 116.129,108.661 116.129,100.802 112.907,100.802 112.907,100.643 69.571,100.643 69.571,145.425
SGND-C3 on Top Layer "SGND-C3_L01_P215" (solid, pour order 215): 100.762,131.547 100.762,137.262 82.753,137.262 82.753,138.836 81.915,138.836 81.915,109.296 89.738,109.296 89.738,129.184 104.704,129.184 104.704,127.498 108.915,127.498 108.915,131.547 108.915,127.498 108.915,131.547
GND on Top Layer "GND_L01_P248" (solid, remove dead copper, pour order 248): 332.994,328.212 332.994,307.125 314.452,307.125 314.452,250.114 332.994,250.114 332.994,226.022 314.452,226.022 314.452,168.224 332.994,168.224 332.994,145.823 314.452,145.823 314.452,88.214 332.994,88.214 332.994,64.721 314.452,64.721 314.452,4.521 131.724,4.521 131.724,328.212
VD-C3 on Top Layer "VD-C3_L01_P214" (solid, pour order 214): 269.164,128.117 250.484,128.117 250.484,163.576 269.164,163.576
NetC61_1 on Top Layer "NETC61_1_L01_P172" (solid, pour order 172): 236.652,36.626 235.623,36.626 235.623,34.671 244.575,34.671 244.575,9.575 223.713,9.575 223.713,7.213 248.818,7.213 248.818,41.148 236.652,41.148
NetC84_1 on Top Layer "NETC84_1_L01_P170" (solid, pour order 170): 236.652,117.729 235.623,117.729 235.623,115.773 244.575,115.773 244.575,90.678 223.713,90.678 223.713,88.316 248.818,88.316 248.818,122.25 236.652,122.25
NetC38_1 on Top Layer "NETC38_1_L01_P142" (solid, pour order 142): 236.652,198.831 235.623,198.831 235.623,196.875 244.575,196.875 244.575,171.78 223.713,171.78 223.713,169.418 248.818,169.418 248.818,203.352 236.652,203.352
NetC15_1 on Top Layer "NETC15_1_L01_P053" (solid, pour order 53): 236.652,279.933 235.623,279.933 235.623,277.978 244.575,277.978 244.575,252.882 223.713,252.882 223.713,250.52 248.818,250.52 248.818,284.455 236.652,284.455
AC_N on Top Layer "AC_N_L01_P005" (solid, pour order 5): 393.624,200.889 370.459,200.889 370.459,159.512 393.624,159.512 393.624,41.974 423.266,41.974 423.266,302.387 393.624,302.387 393.624,290.957
NetC105_1 on Top Layer "NETC105_1_L01_P141" (solid, pour order 141): 180.983,288.29 192.659,288.29 192.659,272.026 180.408,272.026 179.833,271.451 179.833,267.837 178.283,267.837 178.283,271.438 177.183,272.538 177.183,284.615 175.539,286.258 175.539,291.871 180.983,291.871
NetC140_1 on Top Layer "NETC140_1_L01_P140" (solid, pour order 140): 180.983,207.188 192.659,207.188 192.659,190.923 180.408,190.923 179.833,190.348 179.833,186.735 178.283,186.735 178.283,190.336 177.183,191.436 177.183,203.512 175.539,205.156 175.539,210.769 180.983,210.769
NetC175_1 on Top Layer "NETC175_1_L01_P130" (solid, pour order 130): 180.983,126.085 192.659,126.085 192.659,109.821 180.408,109.821 179.833,109.246 179.833,105.633 178.283,105.633 178.283,109.234 177.183,110.333 177.183,122.41 175.539,124.053 175.539,129.667 180.983,129.667
SGND-C2 on Top Layer "SGND-C2_L01_P129" (solid, pour order 129): 100.868,242.9 100.868,237.261 98.328,237.261 98.328,240.977 96.194,240.977 96.194,241.292 94.158,241.292 94.158,237.261 69.571,237.261 69.571,247.109 94.158,247.109 94.158,242.24 96.194,242.24 96.194,242.9
SGND-C3 on Top Layer "SGND-C3_L01_P109" (solid, pour order 109): 100.868,161.798 100.868,156.159 98.328,156.159 98.328,159.874 96.194,159.874 96.194,160.189 94.158,160.189 94.158,156.159 69.571,156.159 69.571,166.007 94.158,166.007 94.158,161.137 96.194,161.137 96.194,161.798
SGND-C1 on Top Layer "SGND-C1_L01_P108" (solid, pour order 108): 100.868,324.002 100.868,318.364 98.328,318.364 98.328,322.079 96.194,322.079 96.194,322.394 94.158,322.394 94.158,318.364 83.312,318.364 83.312,328.212 94.158,328.212 94.158,323.342 96.194,323.342 96.194,324.002
SGND-C3 on Top Layer "SGND-C3_L01_P107" (solid, pour order 107): 100.813,126.009 100.813,121.386 98.273,121.386 98.273,124.086 96.139,124.086 96.139,124.401 94.158,124.401 94.158,109.296 83.312,109.296 83.312,128.857 89.738,128.857 89.738,125.349 96.139,125.349 96.139,126.009
SGND-C4 on Top Layer "SGND-C4_L01_P106" (solid, pour order 106): 100.868,80.695 100.868,75.057 98.328,75.057 98.328,78.772 96.194,78.772 96.194,79.087 94.158,79.087 94.158,75.057 69.571,75.057 69.571,84.905 94.158,84.905 94.158,80.035 96.194,80.035 96.194,80.695
NetC210_1 on Top Layer "NETC210_1_L01_P105" (solid, pour order 105): 180.983,44.983 192.659,44.983 192.659,28.719 180.408,28.719 179.833,28.144 179.833,24.53 178.283,24.53 178.283,28.131 177.183,29.231 177.183,41.308 175.539,42.951 175.539,48.564 180.983,48.564
NetC199_2 on Top Layer "NETC199_2_L01_P095" (solid, pour order 95): 164.374,59.232 164.374,50.012 161.905,50.012 161.905,44.277 161.9,44.272 158.191,44.272 155.169,47.294 136.296,47.294 136.296,53.162 154.781,53.162 160.852,59.232
24VDC-C3 on Top Layer "24VDC-C3_L01_P078" (solid, pour order 78): 121.666,153.924 108.712,153.924 108.712,155.658 94.481,155.658 69.571,155.658 69.571,146.003 83.312,146.003 83.312,137.744 101.194,137.744 101.194,132.004 108.915,132.004 108.915,133.832 121.666,133.832 121.666,136.375
NetC164_2 on Top Layer "NETC164_2_L01_P077" (solid, pour order 77): 164.374,140.335 164.374,131.115 161.905,131.115 161.905,125.38 161.9,125.374 158.191,125.374 155.169,128.397 136.296,128.397 136.296,134.264 154.781,134.264 160.852,140.335
EARTH on Top Layer "EARTH_L01_P065" (solid, pour order 65): 357.033,203.275 357.033,207.759 373.111,207.759 373.111,211.213 392.415,211.213 392.415,203.275
EARTH on Top Layer "EARTH_L01_P062" (solid, pour order 62): 357.033,237.489 357.033,233.005 373.111,233.005 373.111,229.551 392.415,229.551 392.415,237.489
NetC129_2 on Top Layer "NETC129_2_L01_P058" (solid, pour order 58): 164.374,221.437 164.374,212.217 161.905,212.217 161.905,206.482 161.9,206.476 158.191,206.476 155.169,209.499 136.296,209.499 136.296,215.366 154.781,215.366 160.852,221.437
NetC94_2 on Top Layer "NETC94_2_L01_P057" (solid, pour order 57): 164.374,302.539 164.374,293.319 161.905,293.319 161.905,287.584 161.9,287.579 158.191,287.579 155.169,290.601 136.296,290.601 136.296,296.469 154.781,296.469 160.852,302.539
EARTH on Top Layer "EARTH_L01_P034" (solid, pour order 34): 356.946,41.974 356.946,46.458 373.024,46.458 373.024,49.912 392.328,49.912 392.328,41.974
EARTH on Top Layer "EARTH_L01_P021" (solid, pour order 21): 356.946,76.188 356.946,71.704 373.024,71.704 373.024,68.25 392.328,68.25 392.328,76.188
EARTH on Top Layer "EARTH_L01_P013" (solid, pour order 13): 356.946,284.378 356.946,288.862 373.024,288.862 373.024,292.316 392.328,292.316 392.328,284.378
EARTH on Top Layer "EARTH_L01_P012" (solid, pour order 12): 356.946,318.592 356.946,314.108 373.024,314.108 373.024,310.654 392.328,310.654 392.328,318.592
EARTH on Top Layer "EARTH_L01_P011" (solid, pour order 11): 356.946,123.076 356.946,127.56 373.024,127.56 373.024,131.015 392.328,131.015 392.328,123.076
EARTH on Top Layer "EARTH_L01_P010" (solid, pour order 10): 356.946,157.291 356.946,152.806 373.024,152.806 373.024,149.352 392.328,149.352 392.328,157.291
GND on Bottom Layer "GND_L04_P175" (solid, remove dead copper, pour order 175): 332.994,4.547 332.994,26.137 314.257,26.137 314.257,64.898 332.994,64.898 332.994,103.175 314.257,103.175 314.257,146 332.994,146 332.994,183.566 314.257,183.566 314.257,226.199 332.994,226.199 332.994,265.379 314.257,265.379 314.257,307.302 332.994,307.302 332.994,328.193 131.53,328.193 131.53,4.547
PGND-C4 on Bottom Layer "PGND-C4_L04_P210" (solid, pour order 210): 69.571,64.795 69.571,19.075 84.912,19.075 84.912,56.845 81.077,56.845 81.077,64.795
PGND-C3 on Bottom Layer "PGND-C3_L04_P209" (solid, pour order 209): 69.571,145.897 69.571,100.177 84.912,100.177 84.912,137.947 81.077,137.947 81.077,145.897
PGND-C1 on Bottom Layer "PGND-C1_L04_P207" (solid, pour order 207): 69.571,308.102 69.571,262.382 84.912,262.382 84.912,300.152 81.077,300.152 81.077,308.102
SGND-C4 on Bottom Layer "SGND-C4_L04_P206" (solid, pour order 206): 85.573,19.075 95.377,19.075 95.377,40.36 100.813,40.36 100.813,47.015 107.239,47.015 107.239,53.467 111.887,53.467 111.887,77.698 100.99,77.698 100.99,84.937 85.573,84.937 85.573,68.91 90.018,68.91 90.018,56.845 85.573,56.845
SGND-C3 on Bottom Layer "SGND-C3_L04_P205" (solid, pour order 205): 85.573,100.177 95.377,100.177 95.377,121.463 100.813,121.463 100.813,128.117 107.239,128.117 107.239,134.569 111.887,134.569 111.887,158.801 100.99,158.801 100.99,166.04 85.573,166.04 85.573,150.012 90.018,150.012 90.018,137.947 85.573,137.947
SGND-C1 on Bottom Layer "SGND-C1_L04_P204" (solid, pour order 204): 85.573,262.382 95.377,262.382 95.377,283.667 100.813,283.667 100.813,290.322 107.239,290.322 107.239,296.774 111.887,296.774 111.887,321.005 100.99,321.005 100.99,328.244 85.573,328.244 85.573,312.217 90.018,312.217 90.018,300.152 85.573,300.152
NetD19_2 on Bottom Layer "NETD19_2_L04_P174" (solid, pour order 174): 228.956,41.859 233.705,41.859 233.705,25.882 241.503,18.084 241.503,14.706 236.398,14.706 228.956,22.148
NetD26_2 on Bottom Layer "NETD26_2_L04_P173" (solid, pour order 173): 228.956,122.961 233.705,122.961 233.705,106.985 241.503,99.187 241.503,95.809 236.398,95.809 228.956,103.251
NetD12_2 on Bottom Layer "NETD12_2_L04_P166" (solid, pour order 166): 228.956,204.063 233.705,204.063 233.705,188.087 241.503,180.289 241.503,176.911 236.398,176.911 228.956,184.353
HV_S-C4 on Bottom Layer "HV_S-C4_L04_P165" (solid, pour order 165): 335.737,80.531 359.791,80.531 359.791,37.478 335.737,37.478 335.737,50.559 343.713,50.559 343.713,42.202 354.178,42.202 354.178,75.654 343.713,75.654 343.713,67.552 335.737,67.552
HV_S-C3 on Bottom Layer "HV_S-C3_L04_P164" (solid, pour order 164): 335.737,161.633 359.791,161.633 359.791,118.58 335.737,118.58 335.737,131.661 343.713,131.661 343.713,123.305 354.178,123.305 354.178,156.756 343.713,156.756 343.713,148.654 335.737,148.654
HV_S-C1 on Bottom Layer "HV_S-C1_L04_P161" (solid, pour order 161): 335.737,322.935 359.791,322.935 359.791,279.882 335.737,279.882 335.737,292.963 343.713,292.963 343.713,284.606 354.178,284.606 354.178,318.058 343.713,318.058 343.713,309.955 335.737,309.955
VD-C1 on Bottom Layer "VD-C1_L04_P157" (solid, pour order 157): 214.706,258.013 214.706,319.303 234.823,319.303 234.823,310.21 271.399,310.21 297.078,310.21 300.711,306.578 300.711,293.599 297.358,290.246 272.44,290.246 241.605,290.246 241.605,280.01 234.109,280.01 234.109,285.75 228.346,285.75 228.346,273.698 223.164,268.516 223.164,258.013
VD-C2 on Bottom Layer "VD-C2_L04_P156" (solid, pour order 156): 214.706,176.911 214.706,238.201 234.823,238.201 234.823,229.108 271.399,229.108 297.078,229.108 300.711,225.476 300.711,212.496 297.358,209.143 272.44,209.143 241.605,209.143 241.605,198.907 234.109,198.907 234.109,204.648 228.346,204.648 228.346,192.595 223.164,187.414 223.164,176.911
VD-C3 on Bottom Layer "VD-C3_L04_P155" (solid, pour order 155): 214.706,95.809 214.706,157.099 234.823,157.099 234.823,148.006 271.399,148.006 297.078,148.006 300.711,144.373 300.711,131.394 297.358,128.041 272.44,128.041 241.605,128.041 241.605,117.805 234.109,117.805 234.109,123.545 228.397,123.545 228.397,111.544 223.164,106.311 223.164,95.809
VD-C4 on Bottom Layer "VD-C4_L04_P149" (solid, pour order 149): 214.706,14.706 214.706,75.996 234.823,75.996 234.823,66.903 271.399,66.903 297.078,66.903 300.711,63.271 300.711,50.292 297.358,46.939 272.44,46.939 241.605,46.939 241.605,36.703 234.109,36.703 234.109,42.443 228.448,42.443 228.448,30.492 223.164,25.209 223.164,14.706
NetD36_1 on Bottom Layer "NETD36_1_L04_P144" (solid, pour order 144): 172.949,247.091 181.102,238.938 181.102,210.744 170.663,210.744 170.663,232.588 168.91,234.34 139.548,234.34 139.548,247.091
AC_N on Bottom Layer "AC_N_L04_P136" (solid, pour order 136): 404.47,217.83 404.47,213.639 402.946,212.115 402.946,208.495 395.492,208.495 395.492,212.687 385.343,212.687 385.343,217.83
AC_N on Bottom Layer "AC_N_L04_P135" (solid, pour order 135): 385.343,51.386 395.405,51.386 395.405,47.193 405.486,47.193 405.486,56.743 385.343,56.743
AC_N on Bottom Layer "AC_N_L04_P134" (solid, pour order 134): 385.343,293.79 395.405,293.79 395.405,289.597 404.063,289.597 404.063,298.806 385.343,298.806
AC_N on Bottom Layer "AC_N_L04_P132" (solid, pour order 132): 385.343,132.488 395.405,132.488 395.405,128.295 405.486,128.295 405.486,137.846 385.343,137.846
NetC51_2 on Bottom Layer "NETC51_2_L04_P128" (solid, pour order 128): 300.025,68.746 308.432,60.339 308.432,36.666 326.923,36.666 326.923,44.591 319.278,44.591 319.278,76.188 300.025,76.188